# Altium PCB Orion-Bridge-R3.PcbDoc
Units mil, origin at the board's own origin, x right, y up, seen from the top; angles counter-clockwise.
Board outline 2125.98 x 1417.32 mil, 2 copper layers (Top Layer, Bottom Layer), stack 62.992 mil thick; 28 components, 21 nets, 91 pads, 27 vias.
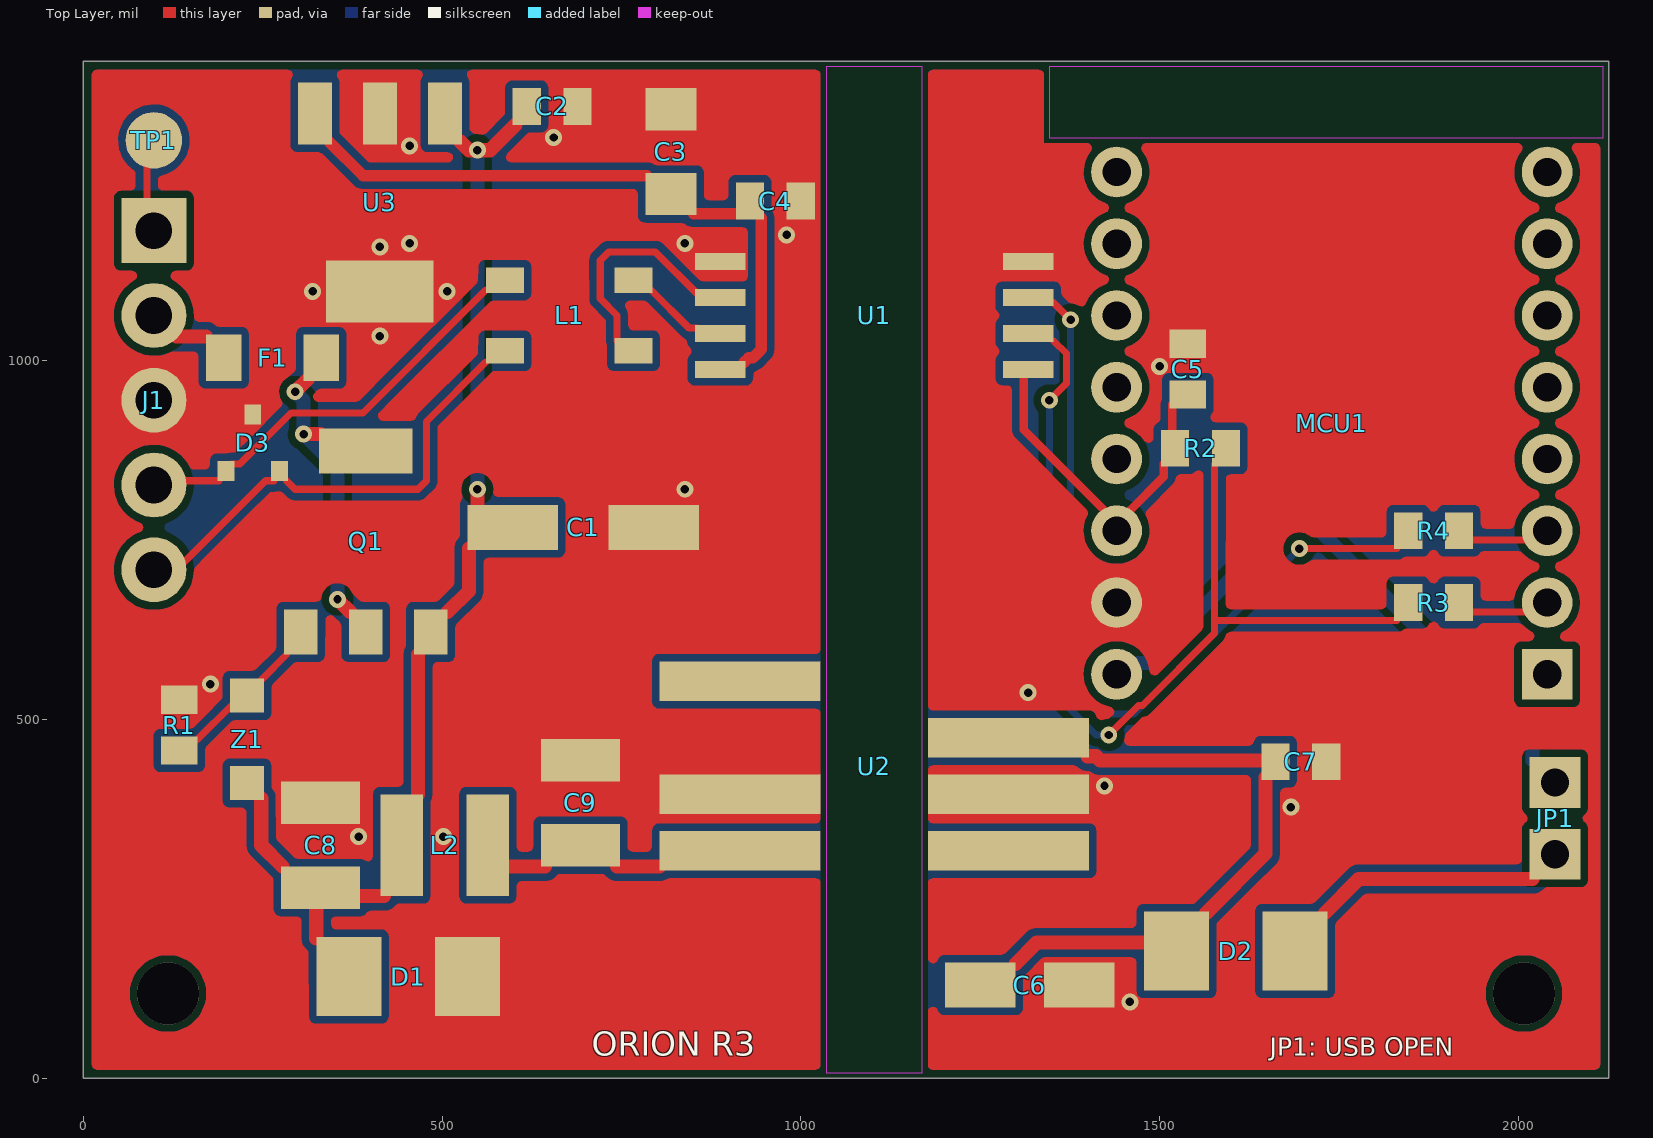
[diagram p0: Top Layer view]
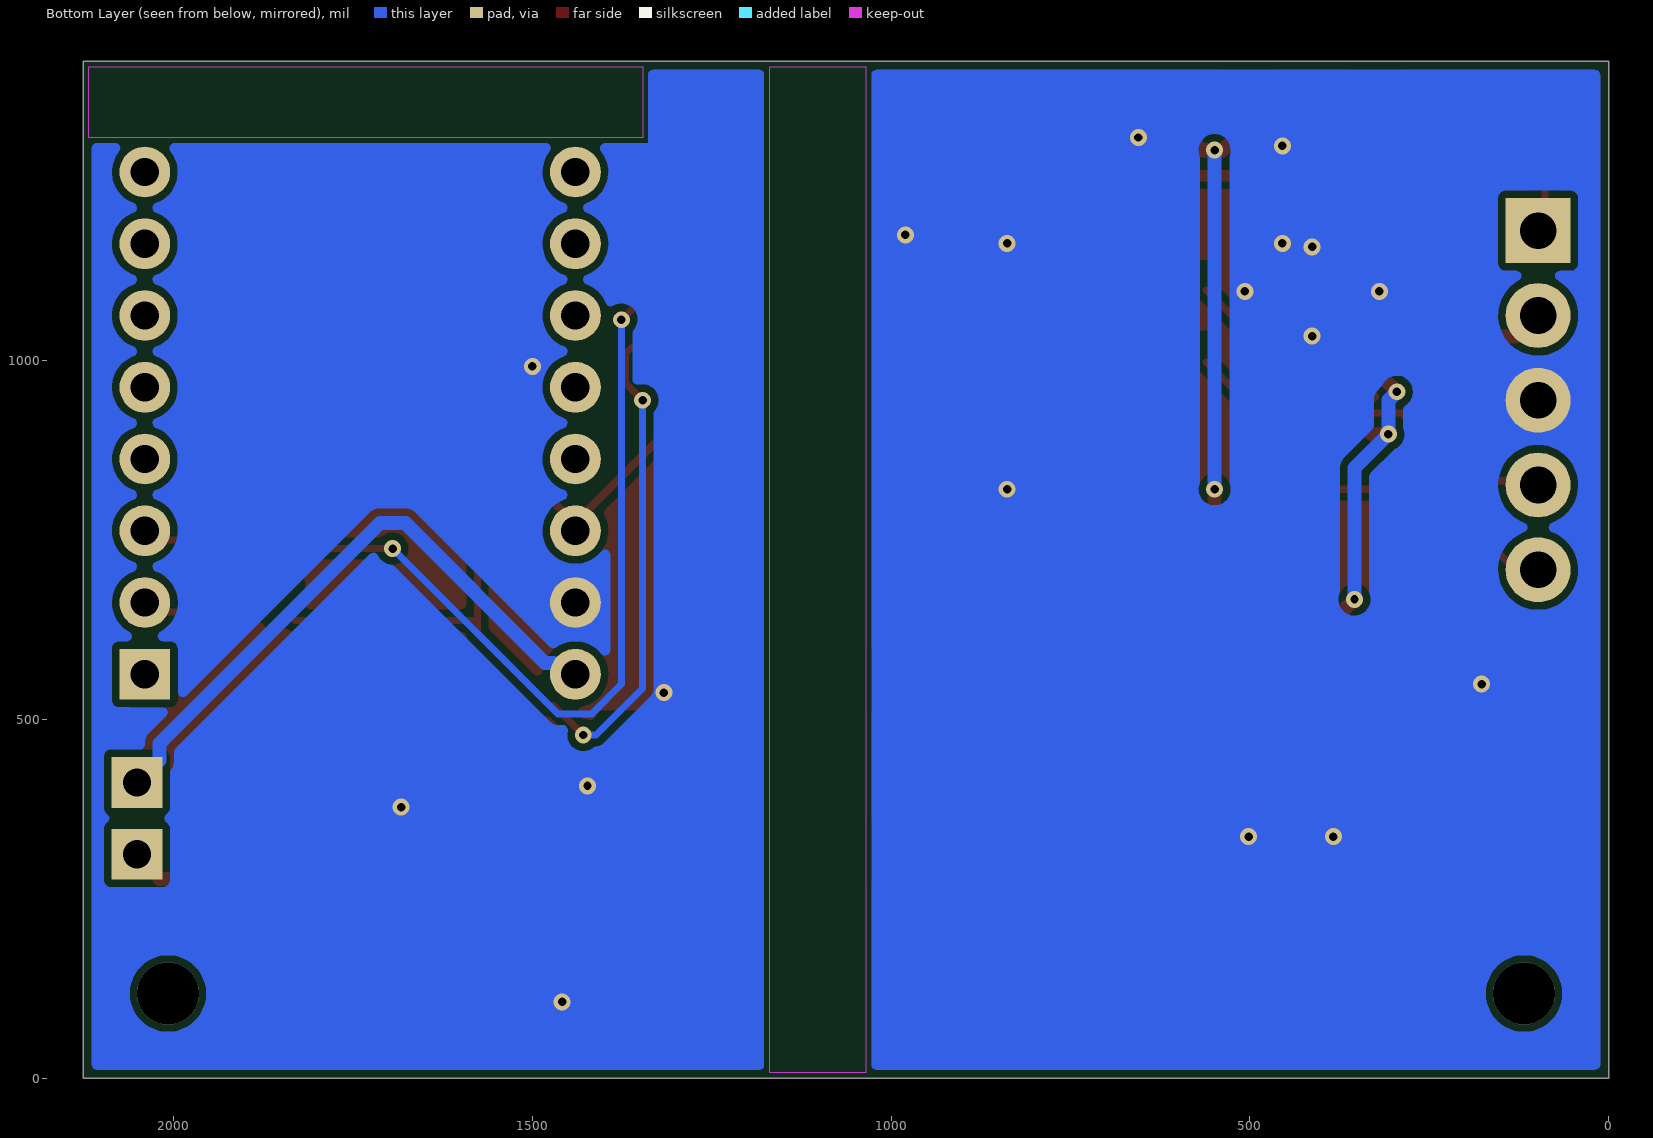
[diagram p1: Bottom Layer view, seen from below]

## Layer stack, top to bottom
Top Layer: signal copper 1.378
Dielectric: dielectric 60.2362, FR-4, Dk 4.3
Bottom Layer: signal copper 1.378

## Board outline
0,0 2125.98,0 2125.98,1417.32 0,1417.32

## Design rules (kind name [scope] priority, off if disabled: settings)
Clearance [All] p0: scope1count=1 scope1_0_kind=Board scope1_0_value=Board scope2count=1 scope2_0_kind=Board scope2_0_value=Board commentlength=0 gap=7.87
Clearance [All] p1: gap=7.87
ComponentClearance [All] p0: scope1count=1 scope1_0_kind=Board scope1_0_value=Board scope2count=1 scope2_0_kind=Board scope2_0_value=Board commentlength=0 gap=9.84 collisioncheckmode=3 verticalgap=9.84 showdistances=FALSE
ComponentClearance [All] p1: gap=9.84 collisioncheckmode=3 verticalgap=9.84 showdistances=FALSE
MinimumSolderMaskSliver [All] p0: scope1count=1 scope1_0_kind=Board scope1_0_value=Board scope2count=1 scope2_0_kind=Board scope2_0_value=Board commentlength=0 minsoldermaskwidth=3.94
MinimumSolderMaskSliver [All] p1: minsoldermaskwidth=3.94
RoutingVias [All] p0: scope1count=1 scope1_0_kind=Board scope1_0_value=Board scope2count=1 scope2_0_kind=Board scope2_0_value=Board commentlength=0 holewidth=11.81 width=23.62 viastyle="Through Hole" minholewidth=11.81 maxholewidth=11.81 minwidth=23.62 maxwidth=23.62
RoutingVias [All] p1: holewidth=11.81 width=23.62 viastyle="Through Hole" minholewidth=11.81 maxholewidth=11.81 minwidth=23.62 maxwidth=23.62
ShortCircuit [All] p0: scope1count=1 scope1_0_kind=Board scope1_0_value=Board scope2count=1 scope2_0_kind=Board scope2_0_value=Board commentlength=0 allowed=FALSE
SolderMaskExpansion TentedVias [IsVia] p0: scope1count=1 scope1_0_kind=Board scope1_0_value=Board scope2count=1 scope2_0_kind=Board scope2_0_value=Board commentlength=0 expansion=-11.81 istentingtop=TRUE istentingbottom=TRUE
SolderMaskExpansion TentedVias [IsVia] p1: expansion=-11.81 istentingtop=TRUE istentingbottom=TRUE
SolderMaskExpansion PadSolderMask [All] p2: expansion=2.95
SolderMaskExpansion PadSolderMask [All] p2: scope1count=1 scope1_0_kind=Board scope1_0_value=Board scope2count=1 scope2_0_kind=Board scope2_0_value=Board commentlength=0 expansion=2.95
UnRoutedNet [All] p0: scope1count=1 scope1_0_kind=Board scope1_0_value=Board scope2count=1 scope2_0_kind=Board scope2_0_value=Board commentlength=0
Width [All] p0: scope1count=1 scope1_0_kind=Board scope1_0_value=Board scope2count=1 scope2_0_kind=Board scope2_0_value=Board commentlength=0 minlimit=9.84 maxlimit=78.74 preferedwidth=11.81
Width [All] p1: minlimit=9.84 maxlimit=78.74 preferedwidth=11.81
2 further rules are at their usual default settings.

## Components (designator, comment, footprint, x,y, rotation, side; value= is the part's Value field where it differs from the comment)
C1 "47uF 50V" PANASONIC_FT_D6P3 696.85,767.72 r0 top
C2 "1uF 50V X7R" C0805 653.54,1354.33 r0 top
C3 "10uF 16V X7R" C1206 818.9,1291.34 r90 top
C4 "100nF 16V X7R" C0805 964.57,1222.44 r0 top
C5 "100nF 16V X7R" C0805 1539.37,988.19 r90 top
C6 "47uF 16V" PANASONIC_FT_D4 1318.9,129.92 r0 top
C7 "100nF 16V X7R" C0805 1696.85,440.94 r0 top
C8 "10uF 50V X7R" C1210 330.71,324.8 r90 top
C9 "10uF 50V X7R" C1210 692.91,383.86 r90 top
D1 "SMBJ20A" SMB 452.76,141.73 r0 top
D2 "SS36" SMB 1606.3,177.17 r180 top
D3 "PESD2CAN24T-Q" SOT23_NEXPERIA_REFLOW 236.22,885.83 r0 top
F1 "T0.8A 63VDC" BOURNS_SF1206S 263.78,1003.94 r0 top
J1 "NMEA Micro-C pigtail" PIGTAIL_5_P3_D1P3 98.43,944.88 r0 top
JP1 "RUN closed / USB open" HDR1X2_2.54 2051.18,362.2 r90 top
L1 "ACT45B-510-2P-TL003" ACT45B 677.17,1062.99 r0 top
L2 "15uH 1A" BOURNS_SRN4018 503.94,324.8 r0 top
MCU1 "ESP32-C3 SuperMini" NOLOGO_C3_SUPERMINI_THT_2X8 1740.16,944.88 r180 top
Q1 "DMP6023LE" SOT223_DIODES_DMP6023LE 393.7,748.03 r0 top
R1 "100k" R0805 133.86,492.13 r90 top
R2 "10k" R0805 1557.09,877.95 r0 top
R3 "33R" R0805 1881.89,662.97 r180 top
R4 "33R" R0805 1881.89,762.97 r0 top
TP1 "Shield / chassis pad" TESTPOINT_2MM 98.43,1307.09 r0 top
U1 "ISO1042DWV" SOIC8_DWV 1102.36,1062.99 r180 top
U2 "R3M-2405S/SMD" R3M_SMD 1102.36,435.04 r0 top
U3 "TPS7B6950QDCYRQ1" SOT223_LDO 413.39,1220.47 r180 top
Z1 "BZT52C12" SOD123 228.35,472.44 r90 top

## Footprints (in the part's own frame and the unit in brackets; to place one, negate y for a bottom-side part, rotate by r counter-clockwise, add the part's x,y. Pads: shape width x height; smd on the part's side, far side on the other; paste and mask are expansions set on the pad)
ACT45B [mm] "TDK ACT45B recommended lands; windings 1-4 and 2-3"
  rect 1.35x0.9 smd: 1(-2.275,1.25) 2(-2.275,-1.25) 3(2.275,-1.25) 4(2.275,1.25)
  body extent -2.58,-1.6 2.57,1.6, height 2.8
BOURNS_SF1206S [mm] "Bourns SF-1206S recommended land pattern: total X span 4.7, inner gap 2.2, pad Y 1.65; maximum body envelope. No polarity."
  rect 1.25x1.65 smd: 1(-1.725,0) 2(1.725,0)
  body extent -1.6,-0.83 1.6,0.83, height 0.72
BOURNS_SRN4018 [mm] "Bourns SRN4018 recommended land pattern: 4.55 total X, two 1.5 x 3.6 pads. Maximum body envelope 4.2 x 4.2. No polarity."
  rect 1.5x3.6 smd: 1(-1.525,0) 2(1.525,0)
  body extent -2.1,-2.1 2.1,2.1, height 1.8
C0805 [mm] "0805 generic capacitor lands; MPN review"
  rect 1x1.3 smd: 1(-0.9,0) 2(0.9,0)
  body extent -1,-0.64 1,0.64, height 1.22
C1206 [mm] "1206 generic capacitor lands; effective capacitance review"
  rect 1.5x1.8 smd: 1(-1.5,0) 2(1.5,0)
  body extent -1.6,-0.81 1.6,0.81, height 1.63
C1210 [mm] "1210 generic capacitor lands; effective capacitance review"
  rect 1.5x2.8 smd: 1(-1.5,0) 2(1.5,0)
  body extent -1.6,-1.26 1.6,1.26, height 2.52
HDR1X2_2.54 [mm] "TBD 2.54 mm service jumper; open BEFORE connecting USB"
  rect 1.8x1.8 hole 1: 1(-1.27,0) 2(1.27,0)
  body extent -2.55,-1.27 2.55,1.27, height 7.2
NOLOGO_C3_SUPERMINI_THT_2X8 [mm] "Nologo 16-pin carrier interface; 15.24 mm rows / 2.54 mm pitch. Local assembly-model height 7.2 mm assumes 3.1 mm carrier-to-module underside, 1.0 mm module PCB and 3.1 mm USB body. This is not a verified manufacturer maximum; actual header seating and module revision must be checked."
  round 1.8 hole 1: 0(7.62,-8.079) 1(7.62,-5.539) 2(7.62,-2.999) 3(7.62,-0.459) 3V3(7.62,4.621) 4(7.62,2.081) 5V(7.62,9.701) 6(-7.62,7.161) 7(-7.62,4.621) 8(-7.62,2.081) 9(-7.62,-0.459) 10(-7.62,-2.999) 20(-7.62,-5.539) 21(-7.62,-8.079) GND(7.62,7.161)
  rect 1.8x1.8 hole 1: 5(-7.62,9.701)
  body extent -9,-11.25 9,11.75, height 7.2
PANASONIC_FT_D4 [mm] "Panasonic FT standard size B land pattern: a=1.0 gap, b=2.5 pad length, c=1.6 pad width. Body is maximum plastic-base envelope; can nominal diameter 4.0. Pin 1 positive, pin 2 negative."
  rect 2.5x1.6 smd: 1(-1.75,0) 2(1.75,0)
  body extent -2.69,-2.15 2.69,2.15, height 6.11
PANASONIC_FT_D6P3 [mm] "Panasonic FT standard size D land pattern: a=1.8 gap, b=3.2 pad length, c=1.6 pad width. Body is maximum plastic-base envelope; can nominal diameter 6.3. Pin 1 positive, pin 2 negative."
  rect 3.2x1.6 smd: 1(-2.5,0) 2(2.5,0)
  body extent -3.7,-3.3 3.7,3.3, height 6.11
PIGTAIL_5_P3_D1P3 [mm] "Designed carrier wire-solder interface, 3.0 pitch, 1.3 finished-hole target, 0.5 radial annulus. Pin numbering is logical NMEA: 1 shield, 2 NET-S, 3 NET-C, 4 CAN-H, 5 CAN-L. Cable and strain relief still require a physical selection."
  rect 2.3x2.3 hole 1.3: 1(0,6)
  round 2.3 hole 1.3: 2(0,3) 3(0,0) 4(0,-3) 5(0,-6)
  body extent -0.8,-6.8 0.8,6.8, height 6
R3M_SMD [mm] "RECOM recommended R3M SMD land pattern; 3.8 mm inner pad gap"
  rect 5.7x1.4 smd: 1(-4.75,-3) 2(-4.75,-1) 4(-4.75,3) 5(4.75,-3) 6(4.75,-1) 7(4.75,1)
  body extent -7.46,-4.55 7.46,4.55, height 10.23
R0805 [mm] "0805 generic resistor lands; MPN review"
  rect 1x1.3 smd: 1(-0.9,0) 2(0.9,0)
  body extent -1,-0.64 1,0.64, height 0.63
SMB [mm] "DO-214AA SMB generic lands; 1=cathode 2=anode; verify vendor"
  rect 2.3x2.8 smd: 1(-2.1,0) 2(2.1,0)
  body extent -2.73,-1.8 2.73,1.8, height 2.51
SOD123 [mm] "SOD-123 generic lands; 1=cathode 2=anode; verify vendor"
  rect 1.2x1.2 smd: 1(-1.55,0) 2(1.55,0)
  body extent -1.85,-0.8 1.85,0.8, height 1.21
SOIC8_DWV [mm] "TI DWV0008A manufacturer land pattern; pin 1 upper left"
  rect 1.8x0.6 smd: 1(-5.45,1.905) 2(-5.45,0.635) 3(-5.45,-0.635) 4(-5.45,-1.905) 5(5.45,-1.905) 6(5.45,-0.635) 7(5.45,0.635) 8(5.45,1.905)
  body extent -5.75,-2.93 5.75,2.93, height 2.82
SOT23_NEXPERIA_REFLOW [mm] "Nexperia SOT23 reflow footprint Fig10: 0.6 x 0.7 copper lands, 1.9 pin pitch and 2.0 row centres. Drawing is rotated 180 degrees to match existing top-view pin1 lower left, pin2 lower right, pin3 upper centre. Paste suggested0.5 x0.6, mask opening1.0 x1.0; set fabrication-specific expansions accordingly."
  rect 0.6x0.7 smd: 1(-0.95,-1) 2(0.95,-1) 3(0,1)
  body extent -1.5,-1.3 1.5,1.3, height 1.11
SOT223_DIODES_DMP6023LE [mm] "Diodes DMP6023LE datasheet suggested SOT223 pad layout: C=2.30, C1=6.40, X=1.20, X1=3.30, Y=Y1=1.60. Pin 1 gate, 2 drain, 3 source, 4 drain tab."
  rect 1.2x1.6 smd: 1(-2.3,-3.2) 2(0,-3.2) 3(2.3,-3.2)
  rect 3.3x1.6 smd: 4(0,3.2)
  body extent -3.27,-3.52 3.27,3.52, height 1.67
SOT223_LDO [mm] "TI TPS7B69-Q1 DCY package drawing4202506/B p20: maximum body6.7x3.7, maximum height1.8, lead pitch2.3. Existing R2 engineering lands retained: 1.2x2.2 signal pads,3.8x2.2 tab,6.3 row centres. TI datasheet provides no DCY recommended land pattern; qualify solder process. Pin4 is GND_BUS tab."
  rect 1.2x2.2 smd: 1(-2.3,-3.15) 2(0,-3.15) 3(2.3,-3.15)
  rect 3.8x2.2 smd: 4(0,3.15)
  body extent -3.35,-3.48 3.35,3.47, height 1.82
TESTPOINT_2MM [mm] "2 mm exposed top-copper test pad; no paste"
  round 2 smd: 1(0,0)
  body extent -1,-1 1,1, height 0.04

## Part data
C1: library part CAP_PANASONIC_EEEFT1H470AP, "47 uF 50 V FT-series SMD aluminum electrolytic, size D, standard product"
C2: library part C_0805_1UF_50V_X7R, "1uF 50V X7R - generic specification; manufacturer/MPN not selected"
C3: library part C_1206_10UF_16V_X7R, "10uF 16V X7R - generic specification; manufacturer/MPN not selected"
C4 C5 C7: library part C_0805_100NF_16V_X7R, "100nF 16V X7R - generic specification; manufacturer/MPN not selected"
C6: library part CAP_PANASONIC_EEEFT1C470AR, "47 uF 16 V FT-series SMD aluminum electrolytic, size B, standard product"
C8 C9: library part C_1210_10UF_50V_X7R, "10uF 50V X7R - generic specification; manufacturer/MPN not selected"
D1: library part SMBJ20A_SMB_GENERIC, "SMBJ20A - generic specification; manufacturer/MPN not selected"
D2: library part SS36_SMB_GENERIC, "SS36 - generic specification; manufacturer/MPN not selected"
D3: library part PESD2CAN24T-QR
F1: library part FUSE_BOURNS_SF1206S080, "0.8 A slow-blow SMD ceramic fuse, 63 VDC, 50 A interrupt rating"
J1: library part NMEA_PIGTAIL_5_P3_D1P3, "Five direct wire-solder pads for a separately selected Micro-C cable; this is a PCB interface, not an invented connector MPN or face view"
JP1: library part JUMPER_1X2_P2_54, "RUN closed / USB open - generic specification; manufacturer/MPN not selected"
L1: library part ACT45B5102PTL003
L2: library part IND_BOURNS_SRN4018_150M, "15 uH semi-shielded power inductor, 1.0 A RMS and 1.1 A saturation rating"
MCU1: library part ESP32_C3_SUPERMINI_NOLOGO, "Nologo ESP32-C3 SuperMini module, two 1x8 carrier headers, GPIO6 TX / GPIO7 RX"
R1: library part R_0805_100K, "100k - generic specification; manufacturer/MPN not selected"
R2: library part R_0805_10K, "10k - generic specification; manufacturer/MPN not selected"
R3 R4: library part R_0805_33R, "33R - generic specification; manufacturer/MPN not selected"
TP1: library part TESTPOINT_2MM, "Shield / chassis pad - generic specification; manufacturer/MPN not selected"
U2: library part R3M-2405S_SMD
Z1: library part BZT52C12_SOD123_GENERIC, "BZT52C12 - generic specification; manufacturer/MPN not selected"

## Free pads (board coordinates)
  round 86.61 hole 86.61 unplated mask+3.94: ""(118.11,118.11) ""(2007.87,118.11)

## Via types
v1: diameter 23.62, hole 11.81, Top Layer to Bottom Layer, tented both sides, 27 vias

## Nets (pads, with @x,y where several pads share a name; then routed paths per layer and width w, separated by ;. In a path a pad name is that pad's centre, name@x,y a point inside that pad or via, vN(x,y) a via of type N, cw(c..) or ccw(c..) an arc to the next point about the centre after c; other vN are vias at no path point)
3V3_LOGIC: C5.1 MCU1.3V3 R2.1 U1.1 | length 355.4
  Top Layer w11.81: U1.1@1311.02,980.32 1311.02,903.54 MCU1.3V3@1423.23,791.34 ; MCU1.3V3@1458.66,791.34 1505.91,838.58 R2.1@1505.91,856.3 ; R2.1@1517.72,903.54 C5.1@1517.72,938.98
5V_AFTER_DIODE: D2.1 JP1.1 | length 308.9
  Top Layer w19.68: D2.1@1730.32,230.31 1777.56,277.56 JP1.1@2019.68,277.56
5V_BUS: C3.1 C4.1 U1.8 U3.3 | length 741.5
  Top Layer w15.75: U3.3@342.52,1305.12 389.76,1257.87 C3.1@785.43,1257.87 ; C3.1@850.39,1204.72 C4.1@915.35,1204.72 ; U1.8@921.26,998.03 927.17,1003.94 933.07,1003.94 944.88,1015.75 C4.1@944.88,1198.82
5V_ISO: C6.1 C7.1 D2.2 U2.7 | length 669
  Top Layer w19.68: 1299.21,159.45 1328.74,188.98 D2.2@1482.28,188.98 ; U2.7@1399.61,448.82 1411.42,448.82 1417.32,442.91 C7.1@1647.64,442.91 ; D2.2@1564.96,230.31 1647.64,312.99 C7.1@1647.64,419.29
5V_MODULE: JP1.2 MCU1.5V | length 780.8
  Bottom Layer w19.68: MCU1.5V@1470.47,578.74 1482.28,578.74 1677.17,773.62 1712.6,773.62 2019.68,466.54 JP1.2@2019.68,442.91
BUS_PROT: C1.1 C2.1 C8.1 D1.1 L2.1 Q1.3 U3.1 Z1.1 | length 1071.6
  Top Layer w19.68: Z1.1@248.03,389.76 248.03,324.8 277.56,295.28 ; 324.8,194.88 C8.1@324.8,236.22 ; C8.1@383.86,253.94 L2.1@419.29,253.94 ; 466.54,395.67 Q1.3@466.54,590.55 ; Q1.3@507.87,649.61 537.4,679.13 C1.1@537.4,738.19 ; U3.1@525.59,1305.12 537.4,1293.31 v1(549.21,1293.31) 566.93,1293.31 C2.1@602.36,1328.74 ; C1.1@549.21,797.24 v1(549.21,820.87)
  Bottom Layer w19.68: v1(549.21,820.87) v1(549.21,1293.31)
CANH: L1.4 U1.7 | length 87
  Top Layer w9.84: L1.4@791.34,1098.43 844.49,1045.28 U1.7@856.3,1045.28
CANH_EXT: D3.1 J1.4 L1.1 | length 501.9
  Top Layer w9.84: J1.4@141.73,832.68 D3.1@188.98,832.68 ; D3.1@206.69,856.3 218.5,856.3 289.37,927.17 389.76,927.17 L1.1@561.02,1098.43
CANL: L1.3 U1.6 | length 287.2
  Top Layer w9.84: L1.3@744.09,1027.56 744.09,1062.99 720.47,1086.61 720.47,1139.76 732.28,1151.57 797.24,1151.57 U1.6@856.3,1092.52
CANL_EXT: D3.2 J1.5 L1.2 | length 574.8
  Top Layer w9.84: J1.5@141.73,720.47 253.94,832.68 D3.2@265.75,832.68 ; D3.2@283.46,832.68 295.28,820.87 466.54,820.87 478.35,832.68 478.35,915.35 L1.2@561.02,998.03
DCDC_IN: C9.1 L2.2 U2.1 | length 112.2
  Top Layer w19.68: L2.2@590.55,295.28 C9.1@643.7,295.28 ; C9.1@744.09,295.28 U2.1@803.15,295.28
FUSED_IN: F1.2 Q1.2 Q1.4 | length 387.6
  Top Layer w19.68: v1(295.28,956.69) F1.2@312.99,974.41 ; v1(307.09,897.64) Q1.4@330.71,897.64 ; v1(354.33,667.32) Q1.2@372.05,649.61
  Bottom Layer w19.68: v1(295.28,956.69) 307.09,944.88 v1(307.09,897.64) 354.33,850.39 v1(354.33,667.32)
GATE: Q1.1 R1.1 Z1.2 | length 116.9
  Top Layer w9.84: R1.1@159.45,472.44 Z1.2@206.69,519.68 ; Z1.2@248.03,555.12 Q1.1@283.46,590.55
GND_BUS: C1.2 C2.2 C3.2 C4.2 C8.2 C9.2 D1.2 D3.3 J1.3 R1.2 U1.5 U2.2 U3.2 U3.4 | length 2728
  Top Layer w19.68: v1(319.69,1096.46) U3.4@338.58,1096.46 ; v1(413.39,1034.25) U3.4@413.39,1053.15 ; 413.39,1139.76 v1(413.39,1158.66) ; 488.19,1096.46 v1(507.09,1096.46)
  Top Layer w23.62: J1.3@141.73,933.07 224.41,933.07 ; R1.2@159.45,543.31 171.26,543.31 v1(177.17,549.21) ; 248.03,938.98 248.03,1015.75 295.28,1062.99 U3.4@342.52,1062.99 ; v1(383.86,336.61) 383.86,354.33 ; 437.01,1305.12 448.82,1305.12 v1(454.72,1299.21) ; 454.72,1139.76 v1(454.72,1163.39) ; v1(501.97,336.61) v1@507.87,336.61 ; D1.2@507.87,194.88 507.87,407.48 525.59,425.2 C9.2@643.7,425.2 ; v1(655.51,1311.02) C2.2@673.23,1328.74 ; C2.2@708.66,1328.74 C3.2@785.43,1328.74 ; C9.2@732.28,472.44 C1.2@732.28,738.19 ; 744.09,413.39 U2.2@803.15,413.39 ; C1.2@838.58,797.24 v1(838.58,820.87) ; v1(838.58,1163.39) U1.5@856.3,1145.67 ; C3.2@850.39,1322.83 897.64,1275.59 956.69,1275.59 C4.2@986.22,1246.06 ; v1(980.32,1175.2) C4.2@980.32,1198.82
  Bottom Layer w23.62: v1(177.17,549.21) v1@389.76,336.61 ; v1(383.86,336.61) v1(501.97,336.61) ; v1(454.72,1163.39) v1(454.72,1299.21) 501.97,1299.21 537.4,1334.65 631.89,1334.65 v1(655.51,1311.02) ; v1(838.58,820.87) v1(838.58,1163.39) 850.39,1175.2 v1(980.32,1175.2)
GND_LOGIC: C5.2 C6.2 C7.2 MCU1.GND U1.4 U2.6 | length 1833.4
  Top Layer w23.62: U1.4@1287.4,1127.95 1275.59,1127.95 1251.97,1104.33 1251.97,862.2 MCU1.GND@1423.23,690.94 ; v1(1316.93,537.4) MCU1.GND@1417.32,637.8 ; U2.6@1399.61,407.48 v1(1423.23,407.48) ; C6.2@1435.04,106.3 v1(1458.66,106.3) ; v1(1500,992.13) 1505.91,998.03 1511.81,998.03 C5.2@1517.72,1003.94 ; v1(1683.07,377.95) 1712.6,407.48 1712.6,419.29
  Bottom Layer w23.62: v1(1316.93,537.4) 1316.93,513.78 v1(1423.23,407.48) 1458.66,372.05 v1(1458.66,106.3) ; 1452.76,377.95 v1(1683.07,377.95) ; MCU1.GND@1458.66,690.94 1500,732.28 v1(1500,992.13)
GPIO6: MCU1.6 R3.1 | length 70.9
  Top Layer w9.84: 1937.01,649.61 MCU1.6@2007.87,649.61
GPIO7: MCU1.7 R4.2 | length 70.9
  Top Layer w9.84: 1937.01,750 MCU1.7@2007.87,750
NET_S: F1.1 J1.2 | length 41.3
  Top Layer w19.68: J1.2@129.92,1033.46 F1.1@171.26,1033.46
RXD: R4.1 U1.3 | length 1108.5
  Top Layer w9.84: 1352.36,1080.71 v1(1375.98,1057.09) ; v1(1694.88,738.19) R4.1@1830.71,738.19
  Bottom Layer w9.84: v1(1375.98,1057.09) 1375.98,549.21 1417.32,507.87 1464.57,507.87 v1(1694.88,738.19)
SHIELD: J1.1 TP1.1 | length 47.2
  Top Layer w9.84: J1.1@88.58,1222.44 TP1.1@88.58,1269.68
TXD: R2.2 R3.2 U1.2 | length 1307.5
  Top Layer w9.84: v1(1346.46,944.88) 1370.08,968.5 1370.08,1009.84 1352.36,1027.56 ; v1(1429.13,478.35) 1470.47,519.68 1476.38,519.68 1576.77,620.08 R2.2@1576.77,856.3 ; 1576.77,637.8 R3.2@1830.71,637.8
  Bottom Layer w9.84: v1(1346.46,944.88) 1346.46,543.31 1411.42,478.35 v1(1429.13,478.35)
pads on no net: MCU1.0 MCU1.1 MCU1.2 MCU1.3 MCU1.4 MCU1.5 MCU1.8 MCU1.9 MCU1.10 MCU1.20 MCU1.21 U2.4 U2.5

## Keep-outs
Keep-Out Layer:
  region: 1035.43,7.87 1169.29,7.87 1169.29,1409.45 1035.43,1409.45
  region: 1346.46,1311.02 2118.11,1311.02 2118.11,1409.45 1346.46,1409.45

## Other copper
Top Layer:
  drawing of 67 lines, arcs and shapes, not listed
Bottom Layer:
  region net GND_BUS: 18.9,12.01 17.11,12.24 15.45,12.93 13.43,14.7 12.53,16.26 12.01,18.9 12.01,1398.43 12.24,1400.21 12.93,1401.87 14.7,1403.89 17.11,1405.08 18.9,1405.32 42.32,1405.32 42.32,1135.94 42.32,12.01
  region net GND_BUS: 42.32,12.01 42.32,1135.94 42.38,1135.52 42.38,1064.32 42.33,1063.3 42.38,1062.04 42.38,824.24 42.38,12.01
  region net GND_BUS: 42.38,1405.32 42.38,1226.9 42.33,1226.49 42.32,1135.94 42.32,1405.32
  region net GND_BUS: 42.38,12.01 42.38,824.24 42.9,818.76 43.95,813.36 45.53,808.08 47.62,802.99 50.19,798.12 53.23,793.53 56.71,789.26 60.59,785.36 64.68,781.97 64.68,753.46 60.52,750.02 55.26,744.49 51.95,740.08 49.06,735.3 46.68,730.34 43.93,721.99 42.9,716.67 42.4,711.64 42.63,702.86 43.45,697.5 44.68,692.59 46.51,687.4 48.84,682.41 51.66,677.68 54.92,673.25 58.6,669.15 62.66,665.44 64.68,663.93 64.68,121.5 64.68,114.72 64.68,12.01
  region net GND_BUS: 64.68,1405.32 64.68,1237.2 53.26,1237.2 49.22,1236.45 47.55,1235.63 45.66,1234.18 44.43,1232.78 43.25,1230.72 42.65,1228.96 42.38,1226.9 42.38,1405.32
  region net GND_BUS: 45.66,1128.02 47.94,1126.35 50.13,1125.44 51.96,1125.08 64.68,1125.02 64.68,1107.77 60.98,1104.76 57.01,1100.83 53.23,1096.23 50.19,1091.64 47.62,1086.78 45.53,1081.68 43.93,1076.32 42.63,1068.8 42.38,1064.32 42.38,1135.52 42.76,1132.81 43.9,1130.23
  region net GND_BUS: 42.57,1057.72 43.45,1051.83 44.83,1046.41 47.58,1039.29 50.42,1033.96 53.55,1029.33 57.01,1025.15 60.92,1021.28 64.68,1018.21 64.68,871.55 60.92,868.49 57.01,864.61 53.5,860.37 50.42,855.8 47.81,850.96 45.68,845.88 44.06,840.62 42.97,835.22 42.4,829.75 42.38,824.24 42.38,1062.04
  region net GND_BUS: 64.68,12.01 64.68,114.72 65.04,111.01 66.37,104.36 67.45,100.79 70.04,94.53 71.8,91.24 75.57,85.61 77.93,82.72 82.72,77.93 85.61,75.57 91.24,71.8 94.53,70.04 100.79,67.45 104.36,66.37 111.01,65.04 114.72,64.68 121.5,64.68 125.21,65.04 131.86,66.37 135.43,67.45 141.69,70.04 144.98,71.8 150.61,75.57 153.5,77.93 154.52,78.96 154.52,12.01
  region net GND_BUS: 154.52,1405.32 154.52,1226.29 153.78,1230.31 152.95,1231.98 151.51,1233.86 150.1,1235.09 148.05,1236.28 146.28,1236.88 143.59,1237.2 64.68,1237.2 64.68,1405.32
  region net GND_BUS: 153.5,158.29 150.61,160.65 144.98,164.42 141.69,166.18 135.43,168.77 131.86,169.85 125.21,171.18 121.5,171.54 114.72,171.54 111.01,171.18 104.36,169.85 100.79,168.77 94.53,166.18 91.24,164.42 85.61,160.65 82.72,158.29 77.93,153.5 75.57,150.61 71.8,144.98 70.04,141.69 67.45,135.43 66.37,131.86 65.04,125.21 64.68,121.5 64.68,663.93 67.07,662.14 71.78,659.29 76.75,656.92 81.93,655.04 87.26,653.68 92.7,652.85 98.2,652.56 103.7,652.81 109.15,653.6 114.5,654.91 122.61,658.04 129.85,662.19 133.84,665.15 137.87,668.78 143.35,675.06 148.01,682.41 151.35,690.05 153.51,698.02 154.28,703.39 154.52,708.35 154.52,157.26
  region net GND_BUS: 67.95,1125 69.74,1124.76 72.16,1123.57 73.43,1122.29 74.33,1120.72 74.79,1118.98 74.78,1117.17 74.3,1115.43 72.79,1113.2 65.25,1108.23 64.68,1107.77 64.68,1125.02
  region net GND_BUS: 65.19,1017.8 69.78,1014.76 74.64,1012.18 79.74,1010.1 85.01,1008.52 90.41,1007.47 95.9,1006.95 101.4,1006.97 106.88,1007.53 112.27,1008.63 117.53,1010.25 122.61,1012.37 127.46,1014.99 132.09,1018.12 137.94,1023.17 143.3,1029.33 146.7,1034.42 150.14,1041.24 152.2,1047 153.88,1054.54 154.47,1060.55 154.23,1068.71 153.39,1074.24 151.32,1081.68 149.01,1087.26 145.24,1093.9 141.59,1098.82 136.26,1104.41 131.6,1108.23 124.06,1113.2 122.96,1114.63 122.26,1116.29 122.07,1118.98 122.92,1121.54 124.02,1122.97 125.45,1124.07 127.11,1124.76 128.9,1125 143.81,1125.01 146.28,1125.32 148.05,1125.92 150.46,1127.39 152.14,1129.07 153.6,1131.48 154.2,1133.25 154.52,1135.9 154.52,708.35 153.95,716.67 152.02,725.24 150.34,729.92 148.04,734.83 143.67,741.83 139.78,746.56 133.84,752.17 127,756.94 116.23,762.17 114.39,764.21 113.68,765.9 113.43,767.72 113.68,769.54 114.39,771.23 115.53,772.67 117.01,773.76 125.14,777.44 132.09,781.9 138.31,787.32 141.65,791.01 144.9,795.35 149.01,802.51 151.35,808.16 153.49,816.05 154.47,824.33 154.45,829.75 153.96,834.7 152.2,842.76 149.23,850.56 144.95,858.12 139.78,864.67 135.93,868.49 132.09,871.65 125.07,876.14 117.53,879.52 112.27,881.14 106.88,882.23 101.4,882.79 95.9,882.81 90.41,882.3 85.01,881.24 79.74,879.67 74.64,877.58 69.78,875 65.19,871.96 64.68,871.55 64.68,1018.21
  region net GND_BUS: 83.17,769.54 83.42,767.72 83.17,765.9 81.94,763.45 79.84,761.68 74.24,759.28 69.32,756.62 64.83,753.59 64.68,753.46 64.68,781.97 64.83,781.85 69.39,778.77 74.24,776.15 79.01,774.14 81.32,772.67 82.46,771.23
  region net GND_BUS: 154.52,12.01 154.52,78.96 154.53,78.96
  region net GND_BUS: 154.53,1405.32 154.53,1226.27 154.52,1226.29
  region net GND_BUS: 154.52,157.26 154.52,708.35 154.52,1135.9 154.53,1135.94
  region net GND_BUS: 154.53,12.01 154.53,78.96 158.29,82.72 160.65,85.61 164.42,91.24 166.18,94.53 168.77,100.79 169.85,104.36 171.18,111.01 171.54,114.72 171.54,12.01
  region net GND_BUS: 171.54,1405.32 171.54,121.5 171.18,125.21 169.85,131.86 168.77,135.43 166.18,141.69 164.42,144.98 160.65,150.61 158.29,153.5 154.53,157.26 154.53,1135.94 154.53,1226.27 154.53,1405.32
  region net GND_BUS: 171.54,12.01 171.54,114.72 171.54,121.5 171.54,1405.32 272.65,1405.32 272.65,955.89 272.65,12.01
  region net GND_BUS: 272.65,12.01 272.65,955.89 273.25,951.49 274.68,947.29 276.91,943.46 279.85,940.13 284.5,936.47 285.52,935.07 286.32,932.62 286.42,908.23 286.21,906.55 284.83,901.75 284.45,897.33 285.18,891.92 287.02,887.16 288.77,884.33 291.24,881.47 294.33,878.94 298.63,876.57 299.96,875.53 331.64,843.85 332.74,842.42 333.43,840.76 333.66,838.98 333.66,677.91 331.9,670.34 331.7,667.1 331.91,664.22 333.09,659.49 335.08,655.42 338.11,651.54 341.57,648.63 345.88,646.33 350.22,645.06 355.13,644.7 360.05,645.42 363.2,646.5 366.23,648.07 369.3,650.35 371.69,652.79 373.86,655.88 375.36,658.95 376.36,662.12 376.92,665.9 376.92,12.01
  region net GND_BUS: 376.92,1405.32 376.92,665.9 376.69,670.87 375,677.91 375,850.35 374.27,855.8 372.34,860.52 369.34,864.59 329.77,904.18 328.68,905.61 327.99,907.27 327.76,909.05 327.75,944.92 327.46,948.31 326.72,951.31 325.51,954.23 323.92,956.87 316.82,964.45 312.97,970.81 310.31,973.61 307.18,975.95 303.19,977.9 298.9,979.04 294.47,979.31 290.07,978.72 285.88,977.28 282.04,975.06 278.71,972.12 276.02,968.59 274.07,964.61 272.93,960.32 272.65,955.89 272.65,1405.32
  region net GND_BUS: 376.92,12.01 376.92,665.9 376.92,1405.32 526.59,1405.32 526.59,1294.19 526.59,12.01
  region net GND_BUS: 526.59,12.01 526.59,1294.19 526.87,1289.68 528.54,1282.72 528.54,831.46 528.34,829.78 527.06,825.5 526.59,821.75 526.79,817.77 527.8,813.53 529.64,809.49 531.91,806.27 535.09,803.17 538.81,800.76 542.94,799.12 547.3,798.31 551.74,798.37 556.08,799.3 560.15,801.05 563.81,803.57 566.9,806.75 569.32,810.47 571.22,815.58 571.85,820.64 571.85,12.01
  region net GND_BUS: 571.85,1405.32 571.85,820.64 571.47,824.98 570.09,829.78 569.88,831.46 569.88,1282.72 571.56,1289.68 571.83,1294.19 571.24,1298.51 570.01,1302.25 567.91,1306.07 565.38,1309.15 562.04,1311.96 558.61,1313.9 554.5,1315.32 550.1,1315.93 545.67,1315.66 541.38,1314.54 537.38,1312.61 533.85,1309.93 530.9,1306.61 528.66,1302.78 527.2,1298.59 526.59,1294.19 526.59,1405.32
  region net GND_BUS: 1023.31,12.53 1020.67,12.01 571.85,12.01 571.85,820.64 571.85,1405.32 1020.67,1405.32 1022.45,1405.08 1024.11,1404.39 1026.14,1402.62 1027.03,1401.06 1027.36,1399.41 1027.36,17.91 1027.03,16.26 1025.54,14.03
  region net GND_LOGIC: 179 vertices and 0 holes, not listed, extent 1177.36,12.01 1954.44,1405.32
  region net GND_LOGIC: 1997,459.99 1998.09,458.56 1998.96,456.02 1999.03,442.42 1999.51,438.45 2000.84,434.44 2003.98,429.36 2004.86,426.79 2005.06,375.14 2005.67,372.84 2006.5,371.17 2007.94,369.29 2011.43,366.03 2012.23,364.42 2012.58,362.66 2012.46,360.86 2011.88,359.16 2010.88,357.66 2007.94,355.12 2006.5,353.24 2005.36,350.65 2005,348.83 2005,275.58 2005.85,272.43 2007.03,270.37 2008.26,268.97 2011.4,266.87 2014.56,266.02 2061.31,266.02 2061.31,121.5 2060.94,125.21 2059.62,131.86 2058.54,135.43 2055.94,141.69 2054.18,144.98 2050.42,150.61 2048.05,153.5 2043.26,158.29 2040.38,160.65 2034.74,164.42 2031.45,166.18 2025.19,168.77 2021.62,169.85 2014.97,171.18 2011.26,171.54 2004.48,171.54 2000.77,171.18 1994.13,169.85 1990.56,168.77 1984.3,166.18 1981.01,164.42 1975.37,160.65 1972.49,158.29 1967.7,153.5 1965.33,150.61 1961.56,144.98 1959.81,141.69 1957.21,135.43 1956.13,131.86 1954.81,125.21 1954.44,121.5 1954.44,502.55
  region net GND_LOGIC: 2047.24,458.46 2045.46,458.7 2043.8,459.39 2042.37,460.48 2040.88,462.72 2040.41,464.45 2040.2,469 2039.63,471.94 2038.53,475.01 2036.61,478.38 2034.27,481.18 2010.5,504.95 2009.01,507.18 2008.49,509.82 2009.01,512.46 2010.5,514.69 2011.93,515.79 2014.48,516.65 2061.31,516.7 2061.31,458.42
  region net GND_LOGIC: 2060.33,611.29 2059.24,612.75 2058.57,614.44 2058.36,616.25 2058.95,618.91 2060.52,621.13 2061.31,621.64 2061.31,610.53
  region net GND_LOGIC: 2055.04,706.83 2053.57,707.84 2051.98,709.96 2051.3,712.52 2051.41,714.3 2051.98,715.98 2053.57,718.1 2055.04,719.1 2061.31,721.87 2061.31,704.07
  region net GND_LOGIC: 2059.73,804.88 2055.04,806.83 2053.57,807.84 2051.98,809.96 2051.41,811.64 2051.3,813.41 2051.98,815.98 2053.57,818.1 2055.04,819.1 2061.31,821.9 2061.31,804.05
  region net GND_LOGIC: 2055.04,906.83 2053.57,907.84 2051.98,909.96 2051.41,911.64 2051.3,913.41 2051.98,915.98 2053.57,918.1 2055.04,919.1 2061.31,921.9 2061.31,904.04
  region net GND_LOGIC: 2055.04,1006.83 2053.57,1007.84 2051.98,1009.96 2051.41,1011.64 2051.3,1013.41 2051.98,1015.98 2053.57,1018.1 2055.04,1019.1 2061.31,1021.9 2061.31,1004.04
  region net GND_LOGIC: 2055.04,1106.83 2053.57,1107.84 2051.98,1109.96 2051.41,1111.64 2051.3,1113.41 2051.98,1115.98 2053.57,1118.1 2055.04,1119.1 2061.31,1121.9 2061.31,1104.04
  region net GND_LOGIC: 2055.04,1206.83 2053.57,1207.84 2051.98,1209.96 2051.41,1211.64 2051.3,1213.41 2051.98,1215.98 2053.57,1218.1 2055.04,1219.1 2061.31,1221.87 2061.31,1204.04
  region net GND_LOGIC: 1954.44,12.01 1954.44,114.72 1954.81,111.01 1956.13,104.36 1957.21,100.79 1959.81,94.53 1961.56,91.24 1965.33,85.61 1967.7,82.72 1972.49,77.93 1975.37,75.57 1981.01,71.8 1984.3,70.04 1990.56,67.45 1994.13,66.37 2000.77,65.04 2004.48,64.68 2011.26,64.68 2014.97,65.04 2021.62,66.37 2025.19,67.45 2031.45,70.04 2034.74,71.8 2040.38,75.57 2043.26,77.93 2048.05,82.72 2050.42,85.61 2054.18,91.24 2055.94,94.53 2058.54,100.79 2059.62,104.36 2060.94,111.01 2061.31,114.72 2061.31,12.01
  region net GND_LOGIC: 192 vertices and 0 holes, not listed, extent 2061.31,12.01 2113.98,1302.95
  region net GND_LOGIC: 385 vertices and 0 holes, not listed, extent 1391.73,531.3 2029.02,1302.95

## Silkscreen, mask and mechanical layers (free items; w line width, h text height)
Top Overlay:
  text "ORION R3" at 708.66,31.5 h33.46
  text "JP1: USB OPEN" at 1653.54,31.5 h25.59
Board outline:
  the board outline again, w3.94
Isolation and RF planning:
  lines w3.94: 1027.56,0 1177.17,0 1177.17,1417.32 1027.56,1417.32 1027.56,0 ; 1338.58,1303.15 2125.98,1303.15 2125.98,1417.32 1338.58,1417.32 1338.58,1303.15
Design notes:
  text "ORION BRIDGE R3 / 54 x 36 mm / 2 layers, FR4 1.6 mm, copper 35 um" at 39.37,-78.74 h35.43
  text "GND_BUS / GND_LOGIC isolated, 3.8 mm minimum; antenna zone copper free." at 39.37,-157.48 h35.43
  text "Open JP1 BEFORE USB. Prototype: thermal and actual module qualification pending." at 39.37,-236.22 h35.43